# Altium PCB emergency_pcb.PcbDoc
Units mm, origin at the board's own origin, x right, y up, seen from the top; angles counter-clockwise.
Board outline 77.98 x 47.62 mm, 2 copper layers (Top Layer, Bottom Layer); 13 components, 9 nets, 31 pads, 0 vias.
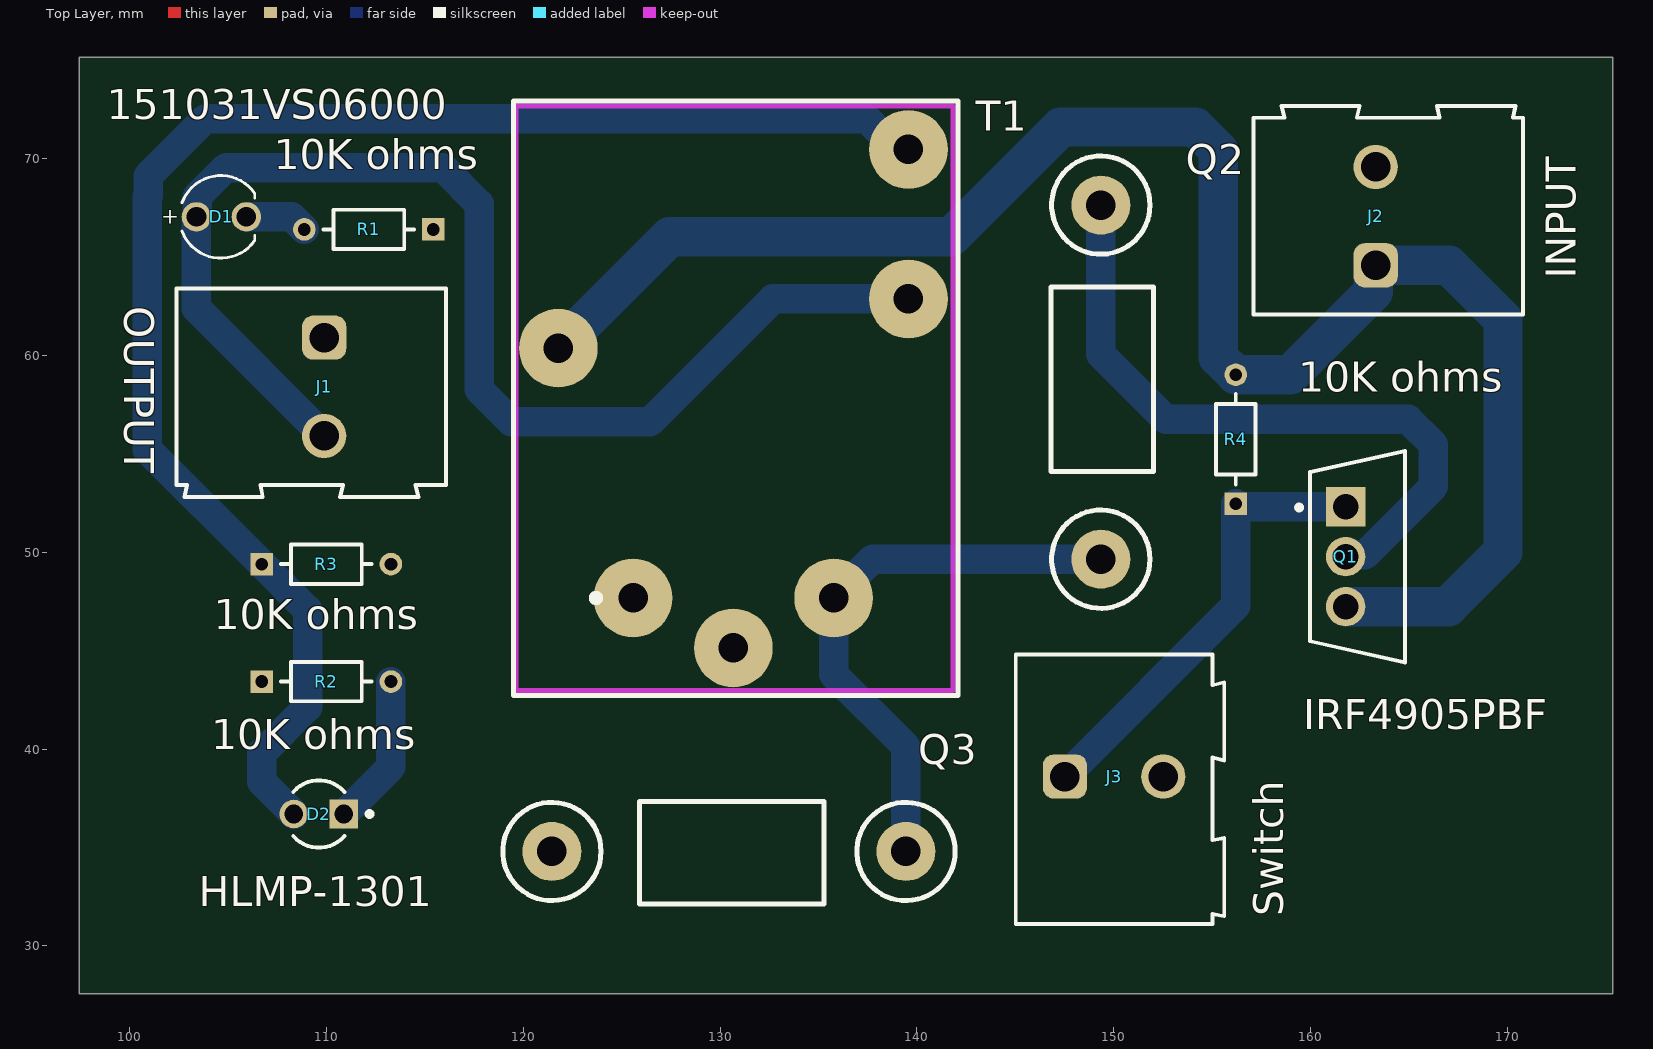
[diagram p0: Top Layer view]
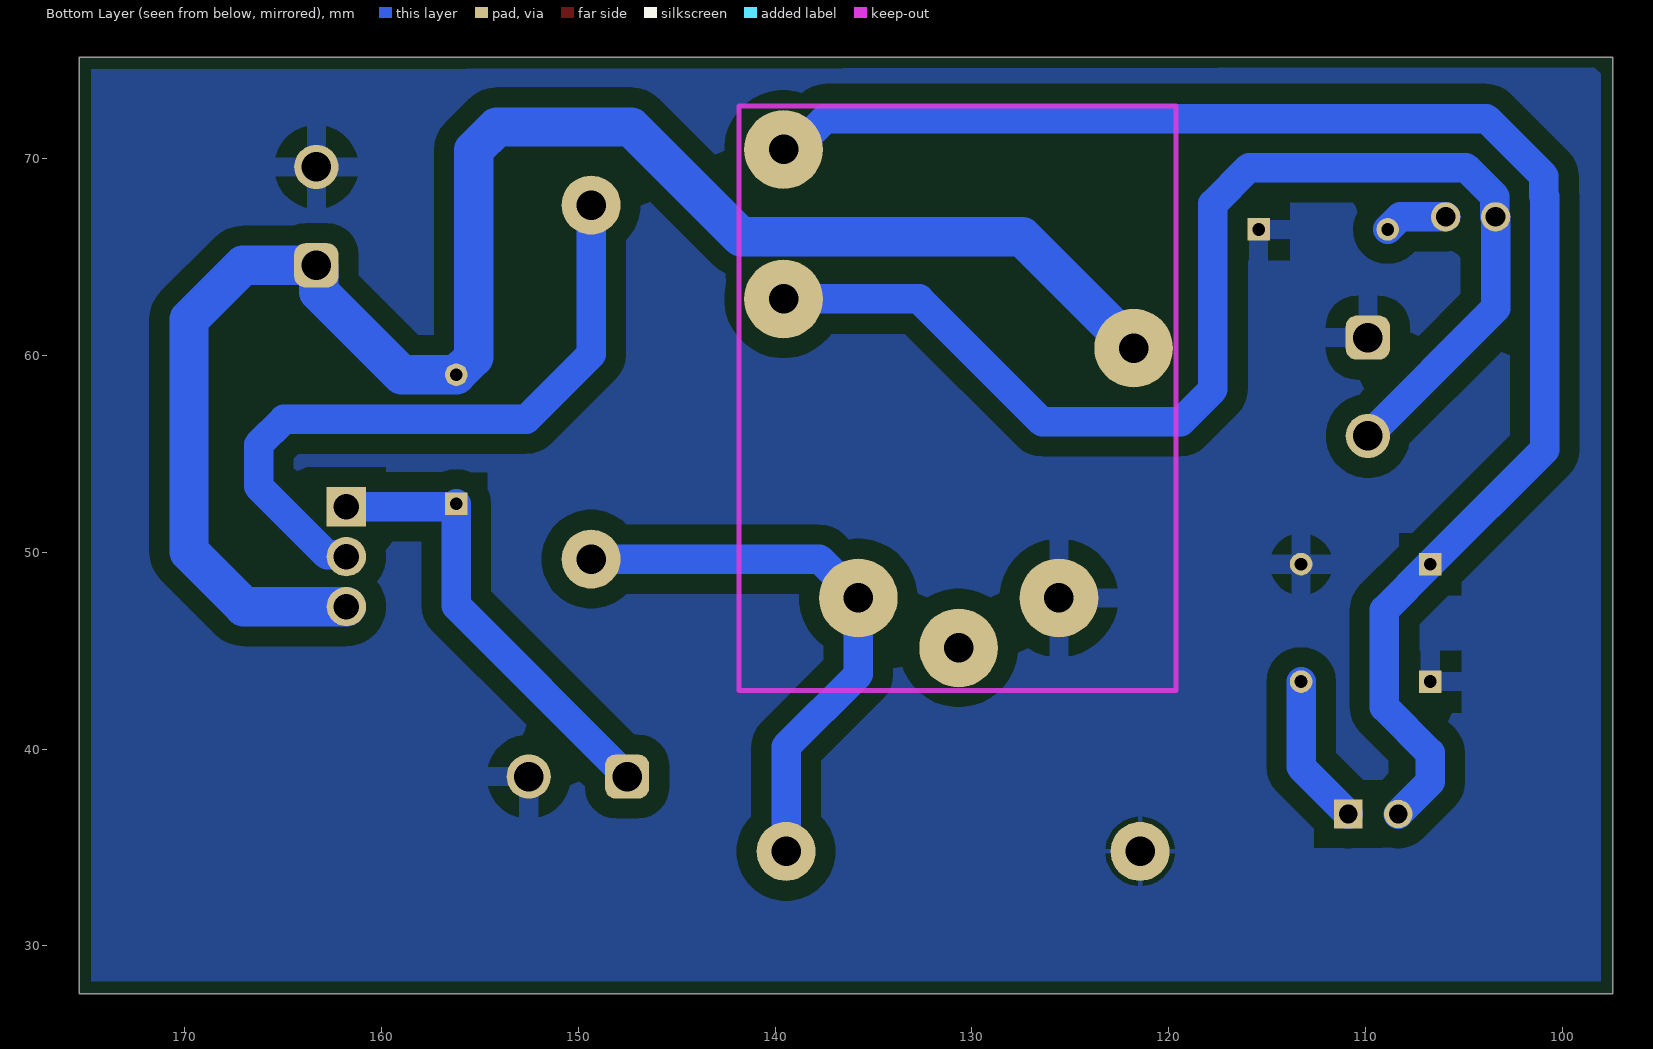
[diagram p1: Bottom Layer view, seen from below]
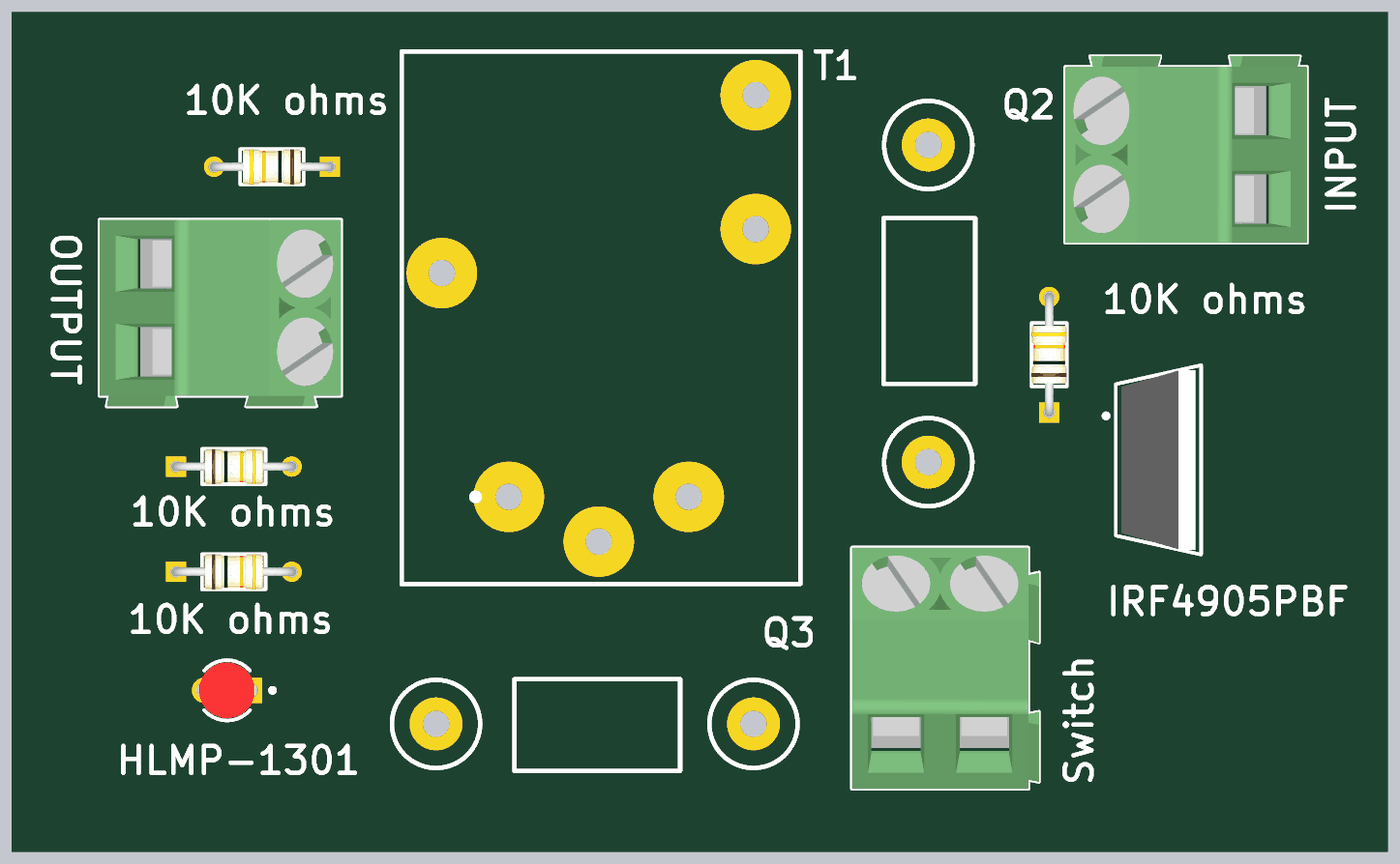
[diagram p2: 3D render of the assembled board from above, using the file's embedded part models]

## Layer stack, top to bottom
Top Solder: solder mask 0.0102, Solder Resist, Dk 3.5
Top Layer: signal copper 0.0356
Dielectric 1: dielectric 0.32, FR-4, Dk 4.8
Bottom Layer: signal copper 0.0356
Bottom Solder: solder mask 0.0102, Solder Resist, Dk 3.5

## Board outline
97.409,27.559 175.387,27.559 175.387,75.184 97.409,75.184

## Design rules (kind name [scope] priority, off if disabled: settings)
Clearance [All] p1: gap=1 ignorepadtopadclearanceinfootprint=FALSE
PlaneClearance [All] p1: clearance=1
PlaneConnect [All] p1: planeconnectstyle=Relief reliefexpansion=1 reliefentries=4 reliefconductorwidth=1 reliefairgap=1
PolygonConnect [All] p1: connectstyle=Relief reliefconductorwidth=1 reliefentries=4 polygonreliefangle="90 Angle" airgapwidth=1
RoutingVias [All] p1: holewidth=0.711 width=1.27 viastyle="Through Hole" minholewidth=0.711 minwidth=1.27 maxholewidth=0.711 maxwidth=1.27
SolderMaskExpansion [All] p1: expansion=0 istentingtop=FALSE
SupplyNets "Schematic Supply Nets_1" [InNet('+12')] p1: voltage=0.000
SupplyNets "Schematic Supply Nets" [InNet('GND')] p2: voltage=0.000
Width [All] p1: maxlimit=1.5 minlimit=0.5 preferedwidth=1
28 further rules are at their usual default settings.

## Components (designator, comment, footprint, x,y, rotation, side; value= is the part's Value field where it differs from the comment)
D1 "151031VS06000" WL-TMRC_D3.95H5.3 1374.648,1337.056 r0 top locked
D2 "HLMP-1301" FP-HLMP-1301-MFG 109.601,36.703 r180 top locked
J1 "OUTPUT" 691211720002 109.22,58.42 r270 top locked
J2 "INPUT" 691211720002 163.972,67.096 r90 top locked
J3 "Switch" 691211720002 150.027,37.958 r0 top locked
Q1 "IRF4905PBF" FP-PG-TO220-3-MFG 162.408,49.784 r0 top locked
Q2 "1N5822" "1N5882 schotky diode" 149.352,49.657 r0 top
Q3 "1N5822" "1N5882 schotky diode" 121.446,34.798 r270 top locked
R1 "10K ohms" FP-CF18-MFG 112.141,66.421 r180 top locked value=10kΩ
R2 "10K ohms" FP-CF18-MFG 109.982,43.434 r0 top locked value=10kΩ
R3 "10K ohms" FP-CF18-MFG 109.982,49.403 r0 top locked value=10kΩ
R4 "10K ohms" FP-CF18-MFG 156.21,55.753 r90 top locked value=10kΩ
T1 "type t relay" "type t relay" 130.673,45.145 r0 top

## Footprints (in the part's own frame and the unit in brackets; to place one, negate y for a bottom-side part, rotate by r counter-clockwise, add the part's x,y. Pads: shape width x height; smd on the part's side, far side on the other; paste and mask are expansions set on the pad)
"1N5882 schotky diode" [mm]
  round 3 hole 1.5: 1(0,18) 2(0,0)
  silkscreen extent -2.54,-2.5 2.67,20.5
691211720002 [mm] "5,00mm - modular - green -45¡ã entry with rising cage clamp - 02p"
  rrect50% 2.25x2.25 hole 1.5: 1(-2.5,0.65)
  round 2.25 hole 1.5: 2(2.5,0.65)
  silkscreen extent -5,-6.85 5.6,6.85, body extent -5,-6.85 5.6,6.85, height 15.72
FP-CF18-MFG [mm]
  rect 1.15x1.15 hole 0.65 paste-2539.97 mask+0: 1(-3.28,0)
  round 1.15 hole 0.65 paste-2539.97 mask+0: 2(3.28,0)
  silkscreen extent -2.3,-1 2.3,1, body extent -3.96,-1.1 3.96,1.1, height 0.25
FP-HLMP-1301-MFG [mm]
  rect 1.45x1.45 hole 0.95 paste-2539.97 mask+0: 1(-1.27,0)
  round 1.45 hole 0.95 paste-2539.97 mask+0: 2(1.27,0)
  silkscreen extent -2.7,-1.71 1.3,1.71, body extent -2.22,-2.22 2.22,2.22, height 0.25
FP-PG-TO220-3-MFG [mm]
  rect 2x2 hole 1.3 paste-2539.97 mask+0: 1(-0.61,2.54)
  round 2 hole 1.3 paste-2539.97 mask+0: 2(-0.61,0) 3(-0.61,-2.54)
  silkscreen extent -3.1,-5.38 2.41,5.38, body extent -2.51,-5.48 2.51,5.48, height 0.25
"type t relay" [mm]
  round 4 hole 1.5: 1(-5.1,2.54) 2(5.1,2.54) 3(0,0) 4(-8.9,15.24) 5(8.9,17.74) 6(8.9,25.34)
  Keep-Out Layer lines w0.254: -11.049,-2.159 11.176,-2.159 11.176,27.559 -11.049,27.559 -11.049,-2.159
  silkscreen extent -11.18,-2.41 11.43,27.81
WL-TMRC_D3.95H5.3 [mm] "THT Mono-color Round Color LED, 2-leads"
  round 1.5 hole 1: 1(-1271.27,-1270) 2(-1268.73,-1270)
  silkscreen extent -1272,-1272.1 -1268.31,-1267.9, body extent -1271.99,-1271.97 -1268.37,-1268.03, height 5.35

## Part data
D1: library part CMP-1488-00004-3, "Led, Green, T-1 (3Mm), 568 Nm, 2.2 V, 30 Ma, 20 Mcd Rohs Compliant: Yes", Case/Package=Radial, Color=Green, Forward Current=100mA, Forward Voltage=2.2V, Manufacturer Lifecycle Status=ACTIVE, Max Operating Temperature=85°C, Max Reverse Voltage (DC)=5V, Min Operating Temperature=-40°C, Test Current=20mA, Dominant Wavelength=568nm, Height=5.3mm, Lead Free="Lead Free", Length=3mm, Lens Size=3mm, Lens Style="Circular, Diffused, Round", Lifecycle Status=Production, Luminous Intensity=30mcd, Mount="Through Hole", Packaging=Bulk, Peak Wavelength=560nm, REACH SVHC=Unknown, RoHS=Compliant, Viewing Angle=60°, Wavelength=568nm, Width=3mm, YEOL="1 = Estimated lifetime > 10 years"
D2: library part CMP-18399-000007-1, "LED RED DIFFUSED T-1 T/H", Colour=Red, Forward Current=10mA, Forward Voltage=1.9V, Manufacturer=Broadcom, Max Junction Temp=+110°C, Package=0, Reverse Voltage=5V, Temperature="-40°C to +100°C", Temperature Range High=+100°C, Temperature Range Low=-40°C, Automotive=No, Category=Diode, ComponentLink2Description=Datasheet, ComponentLink2URL=https://docs.broadcom.com/docs/AV02-1555EN, Device Class L1=Optoelectronics, Device Class L2=LEDs, Device Class L3=unset, Digikey Description="LED RED DIFFUSED T-1 T/H", Lead Free=Yes, Led Orientation=Straight, Luminous Intensity=3.4mcd, Manufacturer Part Number=HLMP-1301, Mouser Description="Standard LEDs - Through Hole Red Diffused 635nm 3.4mcd", Octopart=https://octopart.com/hlmp-1301-broadcom-71130345, Peak Emmision Wavelength=635nm, RoHS=TRUE, Viewing Angle=60°, Wavelength=626nm
J1 J2 J3: library part CMP-1502-02524-3, "211 Series 5MM Pitch Straight, Pcb Terminal Block, Through Hole, 2 Way", Color=Green, Current=10A, Max Operating Temperature=105°C, Min Operating Temperature=-40°C, Voltage=300V, Connector Type="PCB, Terminal Block", Contact Material=Brass, Contact Plating=Tin, Height=15.5mm, Housing Material=Nylon, Lead Pitch=5mm, Length=13.7mm, Mount="Through Hole", Number of Contacts=2, Number of Levels=1, Number of Pins=2, Number of Positions Per Level=2, Packaging=Box, Pitch=5.0038mm, Plating="Brass, Steel", REACH SVHC=Unknown, RoHS=Compliant, Stripping Length=-7mm, Termination=Screw, Width=10mm, Wire Gauge (Max)=24AWG, Wire Gauge (Min)=12AWG, Wire/Cable Gauge=12AWG
Q1: library part CMP-32901-000200-1, "MOSFET P-CH 55V 74A TO-220AB", Case/Package=TO-220, Continuous Drain Current (ID)=74A, Drain to Source Breakdown Voltage=-55V, Drain to Source Resistance=20mR, Gate to Source Voltage (Vgs)=20V, Input Capacitance=3.4nF, Max Operating Temperature=175°C, Max Power Dissipation=200W, Min Operating Temperature=-55°C, Threshold Voltage=-4V, Drain to Source Voltage (Vdss)=-55V, Element Configuration=Single, Halogen Free="Halogen Free", Height=0.6inch, Lead Free="Lead Free", Length=0.414inch, Max Dual Supply Voltage=-55V, Mount="Through Hole", Number of Pins=3, Packaging=Rail/Tube, Power Dissipation=200W, Rds On Max=20mR, REACH SVHC="No SVHC", RoHS Compliant=Yes, Turn-Off Delay Time=61ns, Turn-On Delay Time=18ns, Width=0.185inch
Q2 Q3: "Schotky diode"
R1 R2 R3 R4: library part CMP-26528-000002-1, "RES 10K OHM 1/8W 5% CF AXIAL", Manufacturer="Stackpole Electronics", Manufacturer Part Number=CF18JT10K0, Package=CF18, Power Rating=0.125W, Resistance=10kΩ, Temperature="-55°C to +155°C", Temperature Coefficient=0-500ppm/°C, Temperature Range High=+155°C, Temperature Range Low=-55°C, Tolerance=5%, Voltage Rating=250V, Automotive=No, Category=Res, ComponentLink2Description=Datasheet, ComponentLink2URL=http://www.seielect.com/Catalog/SEI-CF_CFM.pdf, Composition="Carbon Film", Device Class L1="Passive Components", Device Class L2=Resistors, Device Class L3="Through-Hole Resistors", Digikey Description="RES 10K OHM 1/8W 5% CF AXIAL", Height=2mm, Ipc Land Pattern Name=RESAD656W65L360D200, Lead Free=Yes, Octopart=https://octopart.com/cf18jt10k0-stackpole+electronics-19205642, RoHS=TRUE, Series=CF

## Nets (pads, with @x,y where several pads share a name; then routed paths per layer and width w, separated by ;. In a path a pad name is that pad's centre, name@x,y a point inside that pad or via, vN(x,y) a via of type N, cw(c..) or ccw(c..) an arc to the next point about the centre after c; other vN are vias at no path point)
+12: J2.1 Q1.3 R4.2 T1.4 | length 89.4
  Bottom Layer w2: T1.4@121.649,60.261 127.428,66.04 141.732,66.04 147.32,71.628 154.149,71.628 155.321,70.456 155.321,59.922 R4.2 158.982,59.033 163.197,63.248 163.197,64.471 J2.1 167.052,64.596 169.799,61.849 169.799,50.038 167.005,47.244 Q1.3
GND: J1.1 J2.2 J3.2 Q3.2 R1.1 R2.1 R3.2 T1.1
NetD1_1: D1.1 J1.2 T1.5 | length 65.1
  Bottom Layer w1.5: D1.1 103.378,62.412 J1.2 ; D1.1@103.418,67.096 103.418,68.092 104.882,69.556 115.911,69.556 117.746,67.721 117.746,58.283 119.394,56.635 126.433,56.635 132.683,62.885 T1.5
NetD1_2: D1.2 R1.2 | length 3.2
  Bottom Layer w1.5: D1.2 108.226,67.056 R1.2
NetD2_1: D2.1 R2.2 | length 7.7
  Bottom Layer w1.5: D2.1 113.262,39.094 R2.2
NetD2_2: D2.2 R3.1 T1.6 | length 78
  Bottom Layer w1.5: D2.2 106.702,38.332 106.702,39.809 109.027,42.134 109.027,47.078 R3.1 100.878,55.227 100.878,68.092 100.918,68.132 100.918,69.127 103.847,72.056 137.444,72.056 139.015,70.485 T1.6
NetJ3_1: J3.1 Q1.1 R4.1 | length 23.1
  Bottom Layer w1.5: J3.1 156.21,47.291 R4.1 156.359,52.324 Q1.1
NetQ1_2: Q1.2 Q2.1 | length 34.5
  Bottom Layer w1.5: Q2.1 149.352,60.071 152.654,56.769 164.973,56.769 166.257,55.485 166.257,53.363 162.774,49.88 161.894,49.88 Q1.2
NetQ2_2: Q2.2 Q3.1 T1.2 | length 28.8
  Bottom Layer w1.5: Q3.1 139.446,40.132 135.773,43.805 T1.2 135.779,47.685 137.751,49.657 Q2.2
pads on no net: T1.3

## Polygon pours and split planes (outlines as drawn)
GND on Bottom Layer "GND_L02_P000" (solid, remove dead copper, pour order 0): 98.044,74.676 98.044,28.194 174.752,28.194 174.752,74.549

## Text inside footprints (layer, text, board x,y; h text height)
D1: Top Overlay "+" at 101.598,66.706 h0.8